# Altium PCB Vehicle_Interface_Tester.PcbDoc (part 2 of 2)
Units mm, origin at the board's own origin, x right, y up, seen from the top; angles counter-clockwise.
Board outline 170 x 109 mm, 8 copper layers (Top Layer, InnerLayer 1 (GND), InnerLayer 2 (Signal), InnerLayer 3 (GND), InnerLayer 4 (Power), InnerLayer 5 (GND), InnerLayer 6 (Signal), Bottom Layer), stack 1.445 mm thick; 100 components, 59 nets, 436 pads, 116 vias.
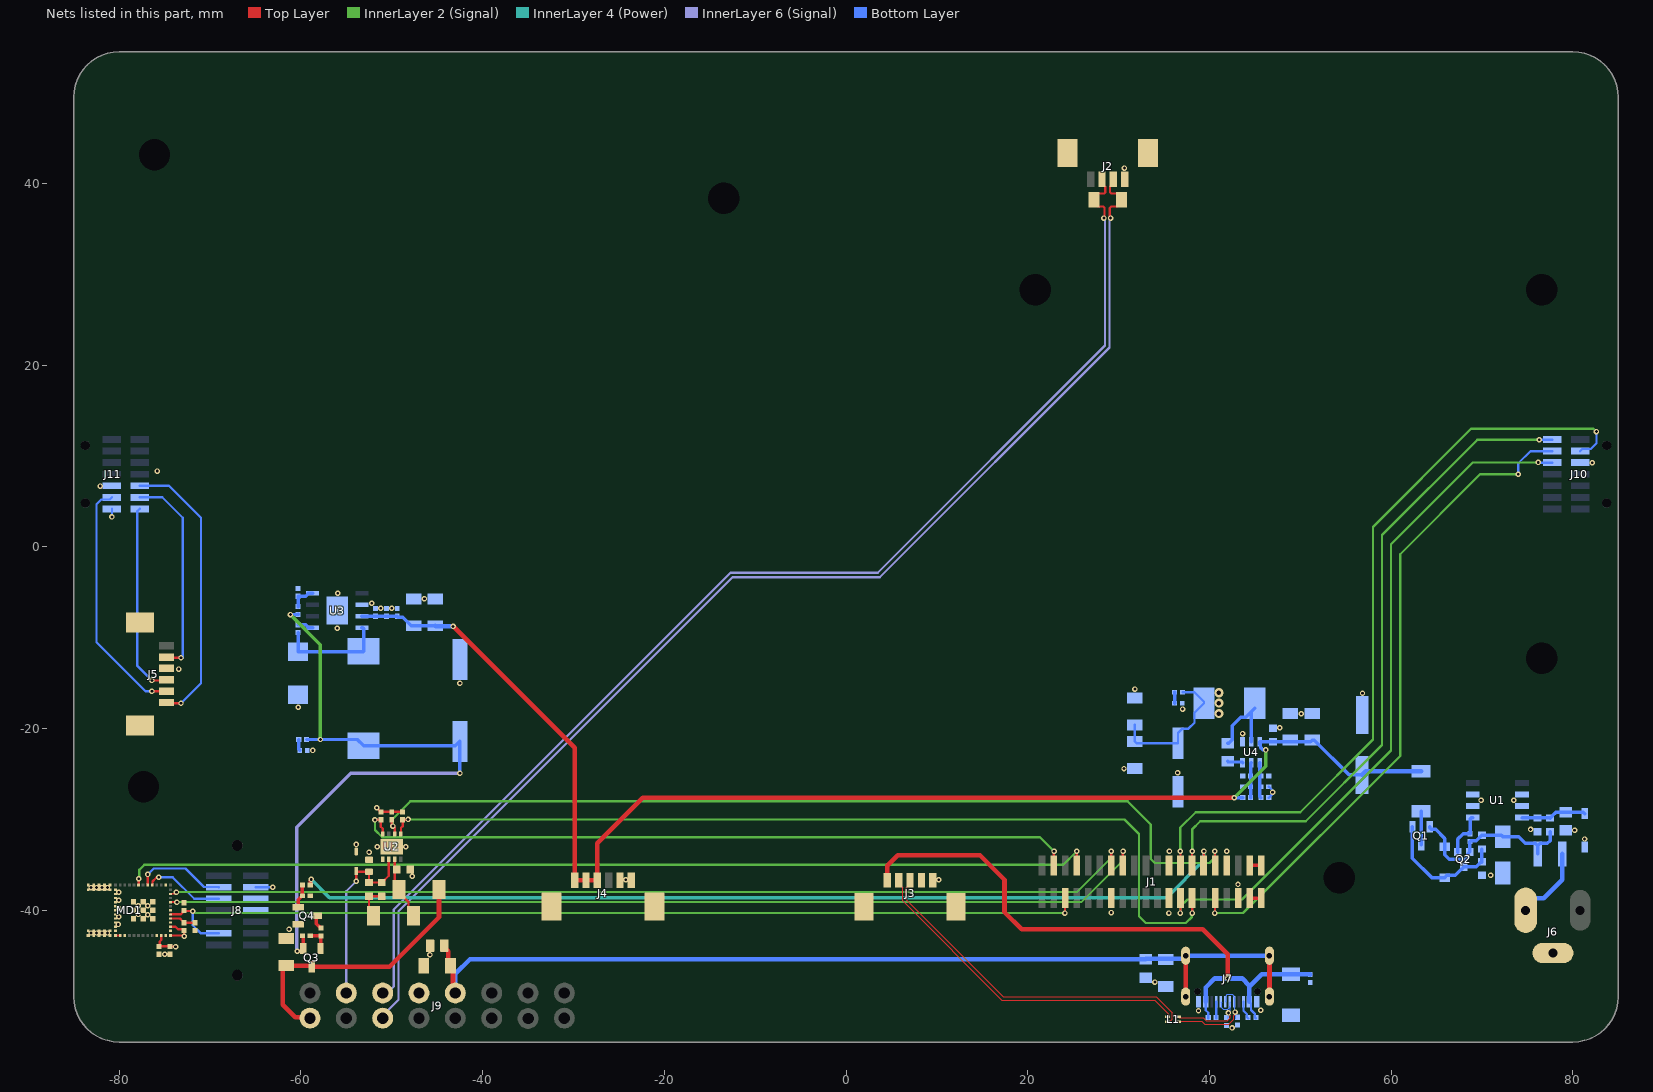
[diagram p8: the nets of this part, all layers, seen from the top]

## Part data (continued)
D5 D6: library part SESD0402X1BN-0010-098, "7V TVS Bidirectional, ESD Suppressors", LCSC Part Number=C2763588, Manufacturer=Littelfuse, Package=0402, Geometry.Height=0.43mm, Manufacturer Part Number=SESD0402X1BN-0010-098
D7: library part 1SMA4736A, "6.8V Zener Diode", LCSC Part Number=C2858511, Manufacturer="MDD(Microdiode Semiconductor)", Package=SMA(DO-214AC), Manufacturer Part Number=1SMA4736A
D10: library part ESD1LIN24DYFR, "42V Clamp 4.3A (8/20µs) Ipp Tvs Diode Surface Mount SOD-323", LCSC Part Number=C20345389, Manufacturer="Texas Instruments", Package=SOD-323, Manufacturer Part Number=ESD1LIN24DYFR
D11 D13: library part "LED Green, 0402 (1005)", "LED Green, 0402 (1005)", Forward Current=20mA, LCSC Part Number=C130723, Manufacturer="Foshan NationStar Optoelectronics", Manufacturer Part Number=NCD0402G1, Package=0402, Color=Green
D12: library part "Schottky, 5A, SS56B", "Schottky Diode, 60V, 5A, DO-214AA, MDD SS56B", LCSC Part Number=C14651, Manufacture="MDD(Microdiode Semiconductor)", Package=SMB(DO-214AA), Manufacturer Part Number=SS56B
J1: "40 Pos, 1.27mm Pitch, Socket, Vertical SMD", LCSC Part Number=C22436137, Manufacturer="Hong Cheng", Package=SMD,P=1.27mm, Manufacturer Part Number=HC-PM127-4.3H-2x20PS
J2: "4 Pos, 1.25mm Pitch, PicoBlade, Horizontal SMD", LCSC Part Number=C696092, Manufacturer=MOLEX, Package="SMD,P=1.25mm,Surface Mount，Right Angle", Manufacturer Part Number=532610471
J3: "5 Pos, 1.25mm Pitch, PicoBlade, Horizontal SMD", LCSC Part Number=C17256390, Manufacturer=MOLEX, Manufacturer Part Number=532610571, Package="SMD,P=1.25mm,Surface Mount，Right Angle"
J4 J5: "6 Pos, 1.25mm Pitch, PicoBlade, Horizontal SMD", LCSC Part Number=C17393620, Manufacturer=MOLEX, Manufacturer Part Number=532610671, Package="SMD,P=1.25mm,Surface Mount，Right Angle"
J6: "Barrel Connector Socket 5.5x2mm", LCSC Part Number=C3096082, Manufacturer=CUI, Package=Plugin,P=5.08mm, Manufacturer Part Number=PJ-002A, Mating Connector=1757022, Part Number=PJ-002A
J7: "CONN USB 2.0 TYPE-C R/A SMT RAISED", LCSC Part Number=C5352763, Manufacturer="Global Connector Technology", Package=SMD, Manufacturer Part Number=USB4800-03-A
J8: "JTAG 14 Pos Header, 1.27mm Pitch, (.5\"), (ST Micro)", LCSC Part Number=C17540447, Manufacturer=Samtec, Manufacturer Part Number=SHF-107-01-L-D-SM-LC, Package=SMD
J10 J11: "14 pos High Reliability Header Strips, 0.050in pitch, Right Angle, Alignment Pins", LCSC Part Number=C21934755, Manufacturer=Samtec, Manufacturer Part Number=FTSH-107-01-X-DH-A, Package="SMD,P=1.27mm,Surface Mount，Right Angle"
L1: library part MCZ1210AH900L2T, "2 Line Common Mode Choke Surface Mount 90 Ohms @ 100 MHz 100mA DCR 1.75Ohm", LCSC Part Number=C114784, Manufacturer=TDK, Manufacturer Part Number=MCZ1210AH900L2TA0G, Package=SMD-4P,1.2x1mm
L2: library part "15uH 7A, 11.5x10mm", "15uH Inductor, 7A, ±20%, 11.5x10mm", LCSC Part Number=C149596, Manufacturer="SXN(Shun Xiang Nuo Elec)", Manufacturer Part Number=SMMS1040-150M, Package=SMD,11.5x10mm
L3: library part "10uH 6A, 7.2x6.6mm", "10uH Inductor, 5.5A, ±20%, 71mΩ, Shielded, 7.2x6mm", LCSC Part Number=C5189958, Manufacturer="SHOU HAN", Manufacturer Part Number=CYA0630-10UH, Package=SMD,7.2x6.6mm
MD1: "Bluetooth Low Energy Module", LCSC Part Number=C5456183, Manufacturer=STMicroelectronics, Package=LGA-77(6.5x10), Manufacturer Part Number=STM32WB1MMCH6TR
MTG1 MTG2 MTG3 MTG4 MTG5 MTG6 MTG7: "M3 Mounting Hole", Manufacturer=DNP, Manufacturer Part Number=DNP
PTC1: library part SMD1210P200TF, "2A Resettable Fuse, 1210", LCSC Part Number=C20808, Manufacturer="RUILON(Shenzhen Ruilongyuan Elec)", Package=1210, Manufacturer Part Number=SMD1210P200TF
Q1 Q3: "MOSFET P-Channel, 60V, VBsemi Elec SQ2309ES-T1-GE3-VB", LCSC Part Number=C6705325, Manufacturer="VBsemi Elec", Package=SOT-23(TO-236), Manufacturer Part Number=SQ2309ES-T1-GE3-VB
Q2: library part "PNP BiPolar Transistor (BJT), 40V, MMBT3906WT1G", "PNP Bipolar Transistor (BJT), 200mA, 40V, SOT-323-3, ON Semi MMBT3906WT1G", LCSC Part Number=C150043, Manufacturer="ON Semiconductor", Manufacturer Part Number=MMBT3906WT1G, Package=SOT-323-3
Q4: library part MMBT3904(RANGE:100-300), "NPN Bipolar Transistor (BJT), 40V, 200mA, SOT-23-3", LCSC Part Number=C20526, Manufacturer="Jiangsu Changjing Electronics Technology Co., Ltd.", Package=SOT-23, Manufacturer Part Number=MMBT3904(RANGE:100-300)
R1: library part "120 ohm, 1206 (3216)", "120 ohm, Resistor, ±1%, 1/4W, 1206 (3216)", LCSC Part Number=C17909, Manufacturer="UNI-ROYAL(Uniroyal Elec)", Manufacturer Part Number=1206W4F1200T5E, Package="1206 (3216 metric)"
R2: library part "24.9K ohm, 0603 (1608)", "24.9K ohm, Resistor, ±1%, 0603 (1608)", LCSC Part Number=C25962, Manufacturer="UNI-ROYAL(Uniroyal Elec)", Manufacturer Part Number=0603WAF2492T5E, Package="0603 (1608 metric)"
R3 R9 R10 R16 R19: library part "10K ohm, 0402 (1005)", "10K ohm, Resistor, ±1%, 0402 (1005)", LCSC Part Number=C881209, Manufacturer="Ever Ohms Tech", Manufacturer Part Number=CR0402F10K0Q10Z, Package="0402 (1005 metric)", Power=100mW
R4: library part "2.49K ohm, 0603 (1608)", "2.49K ohm, Resistor, ±1%, 0603 (1608)", LCSC Part Number=C22908, Manufacturer="UNI-ROYAL(Uniroyal Elec)", Manufacturer Part Number=0603WAF2491T5E, Package="0603 (1608 metric)"
R5: library part "100K ohm, 0603 (1608)", "100K ohm, Resistor, ±1%, 0603 (1608)", LCSC Part Number=C14675, Manufacturer=YAGEO, Manufacturer Part Number=RC0603FR-07100KL, Package="0603 (1608 metric)"
R6 R7: library part "56K ohm, 0402 (1005)", "56K ohm, Resistor, ±1%, 0402 (1005)", LCSC Part Number=C25796, Manufacturer="UNI-ROYAL(Uniroyal Elec)", Manufacturer Part Number=0402WGF5602TCE, Package="0402 (1005 metric)"
R8 R21: library part "10M ohm, 0805 (2012)", "10M ohm, Resistor, ±1%, 0805 (2012)", LCSC Part Number=C26108, Manufacturer="UNI-ROYAL(Uniroyal Elec)", Manufacturer Part Number=0805W8F1005T5E, Package="0805 (2012 metric)"
R11 R12: library part "2K ohm, 0603 (1608)", "2K ohm, ±1%, 0603 (1608)", LCSC Part Number=C22975, Manufacturer="UNI-ROYAL(Uniroyal Elec)", Manufacturer Part Number=0603WAF2001T5E, Package="0603 (1608 metric)"
R13 R14 R15: library part "4.7K ohm, 0402 (1005)", "4.7K ohm, Resistor, ±1%, 0402 (1005)", LCSC Part Number=C25900, Manufacturer="UNI-ROYAL(Uniroyal Elec)", Manufacturer Part Number=0402WGF4701TCE, Package="0402 (1005 metric)"
R17: library part "2.2K ohm, 1206 (3216)", "2.2K ohm, Resistor, ±1%, 1/4W, 1206 (3216)", LCSC Part Number=C17948, Manufacturer="UNI-ROYAL(Uniroyal Elec)", Manufacturer Part Number=1206W4F2201T5E, Package="1206 (3216 metric)"
R18: library part "1K ohm, 0402 (1005)", "1K ohm, Resistor, ±1%, 0402 (1005)", LCSC Part Number=C11702, Manufacturer="UNI-ROYAL(Uniroyal Elec)", Manufacturer Part Number=0402WGF1001TCE, Package="0402 (1005 metric)", Cost=0.013
R20: library part "100K ohm, 0402 (1005)", "100K ohm, Resistor, ±1%, 0402 (1005)", LCSC Part Number=C25741, Manufacturer="UNI-ROYAL(Uniroyal Elec)", Manufacturer Part Number=0402WGF1003TCE, Package="0402 (1005 metric)", Part Number=0402WGF1003TCE
R22: library part "13K ohm, 0402 (1005)", "13K ohm, Resistor, ±1%, 0402 (1005)", LCSC Part Number=C25754, Manufacturer="UNI-ROYAL(Uniroyal Elec)", Manufacturer Part Number=0402WGF1302TCE, Package="0402 (1005 metric)"
R23: library part "21K ohm, 0402 (1005)", "21K ohm, Resistor, ±1%, 0402 (1005)", LCSC Part Number=C25766, Manufacturer="UNI-ROYAL(Uniroyal Elec)", Manufacturer Part Number=0402WGF2102TCE, Package="0402 (1005 metric)"
R24: library part "2K ohm, 0402 (1005)", "2K ohm, Resistor, ±1%, 0402 (1005)", LCSC Part Number=C4109, Manufacturer="UNI-ROYAL(Uniroyal Elec)", Manufacturer Part Number=0402WGF2001TCE, Package="0402 (1005 metric)"
R25: library part "680 ohm, 0402 (1005)", "680 ohm, Resistor, ±1%, 0402 (1005)", LCSC Part Number=C25130, Manufacturer="UNI-ROYAL(Uniroyal Elec)", Manufacturer Part Number=0402WGF6800TCE, Package="0402 (1005 metric)"
R26: library part "300K ohm, 0402 (1005)", "300K ohm, Resistor, ±1%, 0402 (1005)", LCSC Part Number=C25774, Manufacturer="UNI-ROYAL(Uniroyal Elec)", Manufacturer Part Number=0402WGF3003TCE, Package="0402 (1005 metric)"
R27: library part "68K ohm, 0402 (1005)", "68K ohm, Resistor, ±1%, 0402 (1005)", LCSC Part Number=C36871, Manufacturer="UNI-ROYAL(Uniroyal Elec)", Manufacturer Part Number=0402WGF6802TCE, Package="0402 (1005 metric)"
R28: library part "22K ohm, 0402 (1005)", "22K ohm, Resistor, ±1%, 0402 (1005)", LCSC Part Number=C25768, Manufacturer="UNI-ROYAL(Uniroyal Elec)", Manufacturer Part Number=0402WGF2202TCE, Package="0402 (1005 metric)"
R29: library part "15K ohm, 0402 (1005)", "15K ohm, Resistor, ±1%, 0402 (1005)", LCSC Part Number=C25756, Manufacturer="UNI-ROYAL(Uniroyal Elec)", Manufacturer Part Number=0402WGF1502TCE, Package="0402 (1005 metric)"
U1: "Shunt Voltage Reference IC Adjustable 2.495V 36 VV ±1", LCSC Part Number=C6970, Manufacturer="Texas Instruments", Package=SOIC-8, Manufacturer Part Number=TL431AIDR
U2: library part TJA1027TK/20,118, "1/1 Transceiver LINbus 8-HVSON (3x3)", LCSC Part Number=C194379, Manufacturer="NXP Semicon", Package=HVSON-8-EP(3x3), Manufacturer Part Number=TJA1027TK/20,118
U3: "Texas Instruments switching V reg, step down, 5A wide range input TPS5450DDAR", LCSC Part Number=C114425, Manufacturer="Texas Instruments", Package=SOP-8-EP-150mil, Manufacturer Part Number=TPS5450DDAR
U4: "Ti Switching V Regulator, Step Down, 3A, Ti TPS54302DDCR", LCSC Part Number=C311983, Manufacturer="Texas Instruments", Package=TSOT-23-6, Manufacturer Name="Texas Instruments", Manufacturer Part Number=TPS54302DDCR
J9: Vendor="Nemalyn Segura <nemalyn@autotestaid.com>"

## Via types
v1: diameter 0.6, hole 0.3, Top Layer to Bottom Layer, tented both sides, 113 vias
v2: diameter 1, hole 0.5, Top Layer to Bottom Layer, tented both sides, 3 vias

## Nets (pads, with @x,y where several pads share a name; then routed paths per layer and width w, separated by ;. In a path a pad name is that pad's centre, name@x,y a point inside that pad or via, vN(x,y) a via of type N, cw(c..) or ccw(c..) an arc to the next point about the centre after c; other vN are vias at no path point)
3V3: C5.1 C6.1 C23.1 C24.1 C25.1 C26.1 J8.3 J11.1 L3.2 MD1.16 MD1.18 MD1.20 R9.2 R13.2 R14.2 R15.2 R25.2 R27.2 | length 29.7
  Top Layer w0.254: C5.1@-75.6,-43.967 C6.1@-74.4,-43.967 -74.383,-43.984 -73.816,-43.984 v1(-73.8,-44) ; C5.1@-75.6,-43.954 -75.552,-43.906 -75.552,-43.452 -75.364,-43.264 MD1.16@-75.364,-42.775 ; MD1.18@-74.337,-42.775 -73.019,-42.775 -72.944,-42.85 v1(-72.85,-42.85) -72.874,-42.826 R9.2@-72.874,-42.445 ; MD1.20@-74.337,-41.8 -73.8,-41.8 -73.523,-42.077 -72.993,-42.077 -72.85,-42.22 R9.2@-72.85,-42.233 ; v1(-51.65,-28.7) -51.183,-29.167 R15.2@-48.8,-29.167
  Bottom Layer w0.254: v1(-80.8,3.3) J11.1@-80.8,4.19 ; J8.3@-64.968,-37.46 -64.962,-37.466 -63.106,-37.466 v1(-63.1,-37.472) ; C26.1@31.8,-19.579 C25.1@31.8,-21.421 31.984,-21.605 C23.1@36.553,-21.605 36.553,-20.473 37.026,-20 37.7,-20 38.352,-19.348 38.352,-18.248 L3.2@39.4,-17.2 39.4,-17.048 38.352,-16 R25.2@37.033,-16 ; C24.1@46.533,-27.6 46.546,-27.6 46.884,-27.262 46.884,-27.006 46.95,-26.94 46.884,-26.874 46.884,-26.738 46.545,-26.4 R27.2@46.533,-26.4
  other v1: 46.95,-27
  other v2: 41.05,-18.35 41.05,-17.2 41.05,-16.05
3V3_SW: C18.2 L3.1 U4.2 | length 8.8
  Bottom Layer w0.381: C18.2@42,-21.6 42.122,-21.6 42.498,-21.224 42.498,-19.702 43.441,-18.759 44.015,-18.759 L3.1@45,-17.775 ; U4.2@44.6,-21.45 L3.1@44.6,-18.175
14V: C17.1 L2.2 Q3.2 R16.2 R22.2 R23.2 | length 73.2
  Top Layer w0.381: v1(-60.4,-44.5) -59.909,-44.5 -59.75,-44.341 Q3.2@-59.75,-44.2 -59.75,-42.88 -59.83,-42.8 R16.2@-59.833,-42.8
  InnerLayer 2 (Signal) w0.381: v1(-61.15,-7.45) -57.85,-10.75 v1(-57.85,-21.2)
  InnerLayer 6 (Signal) w0.381: v1(-60.4,-44.5) -60.45,-44.45 -60.45,-30.85 -54.5,-24.9 v1(-42.5,-24.9)
  Bottom Layer w0.381: v1(-61.15,-7.45) -61.141,-7.441 -60.309,-7.441 R23.2@-60.3,-7.433 ; R22.2@-59.367,-21.2 v1(-57.85,-21.2) -53.8,-21.2 L2.2@-53.1,-21.9 -43,-21.9 C17.1@-42.5,-21.4 v1(-42.5,-24.9)
14V_SWITCHED: D9.2 J9.16 Q3.3 R17.2 | length 30.3
  Top Layer w0.508: J9.16@-59,-51.87 -59.079,-51.791 -60.609,-51.791 -62,-50.4 -62,-46.45 -61.65,-46.1 R17.2@-61.6,-46.1 -58.896,-46.1 -58.8,-46.196 Q3.3@-58.8,-46.2 -50.25,-46.2 -44.8,-40.75 D9.2@-44.8,-37.7
24V_SW: C12.1 C13.1 C14.1 C15.1 C16.1 C19.1 C20.1 C21.1 C22.1 D1.1 J4.1 J4.2 J4.3 R26.2 U3.7 U4.3 | length 151.3
  Top Layer w0.508: v1(-43.25,-8.75) -29.875,-22.125 J4.1@-29.875,-36.695 J4.2@-28.625,-36.695 J4.3@-27.375,-36.695 -27.375,-32.625 -22.35,-27.6 v1(42.75,-27.6)
  InnerLayer 2 (Signal) w0.381: v1(42.75,-27.6) 46.2,-24.15 v1(46.2,-22.35)
  Bottom Layer w0.381: U3.7@-53.279,-7.635 -53.278,-7.634 C14.1@-49.4,-7.633 C14.1@-49.4,-7.633 -49.4,-7.646 -49.32,-7.725 -48.8,-7.725 -47.847,-8.679 C15.1@-47.6,-8.679 C16.1@-45.2,-8.679 ; v1(42.75,-27.6) R26.2@43.667,-27.6 ; v1(46.2,-22.35) 46.158,-22.308 45.858,-22.308 45.626,-22.076 45.626,-21.796 45.55,-21.72 U4.3@45.55,-21.45 51.129,-21.45 C20.1@51.3,-21.279 51.547,-21.279 55.368,-25.1 C19.1@56.8,-25.1
  Bottom Layer w0.508: C16.1@-45.2,-8.679 -45.147,-8.732 -43.268,-8.732 v1(-43.25,-8.75) ; C19.1@56.8,-25.1 57.2,-24.7 D1.1@63.3,-24.7
+5V: J1.1 J1.3 | length 1.3
  Top Layer w0.381: J1.3@44.443,-35.058 J1.1@45.713,-35.058
BLE_MODULE_SWCLK: J8.6 MD1.34 | length 8.9
  Top Layer w0.254: MD1.34@-76.367,-37.225 -76.344,-37.202 -76.344,-36.844 -75.916,-36.416 -75.716,-36.416 v1(-75.65,-36.35)
  Bottom Layer w0.254: v1(-75.65,-36.35) -74.12,-36.35 -71.74,-38.73 J8.6@-69.033,-38.73
BLE_MODULE_SWDIO: J8.4 MD1.35 | length 10.1
  Top Layer w0.254: MD1.35@-76.868,-37.225 -76.859,-37.216 -76.859,-36.059 v1(-76.85,-36.05)
  Bottom Layer w0.254: v1(-76.85,-36.05) -76.2,-35.4 -72.7,-35.4 -70.662,-37.438 -69.055,-37.438 J8.4@-69.033,-37.46
BLE_RESET: C7.1 J1.36 J8.12 MD1.23 | length 105.1
  Top Layer w0.254: MD1.23@-74.337,-40.45 -73.234,-40.45 -72.993,-40.21 -72.993,-40.189 -72.871,-40.066 -71.934,-40.066 v1(-71.9,-40.1) ; v1(24.1,-40.3) 24.111,-40.289 24.111,-38.669 J1.36@24.123,-38.658
  InnerLayer 2 (Signal) w0.254: v1(-71.9,-40.1) -71.806,-40.1 -71.606,-40.3 v1(24.1,-40.3)
  Bottom Layer w0.254: v1(-71.9,-40.1) -71.9,-41.65 -71.01,-42.54 J8.12@-69.033,-42.54
BLE_RX: J1.27 MD1.28 | length 107.5
  Top Layer w0.203: MD1.28@-74.337,-38.2 -74.313,-38.177 -73.934,-38.177 -73.757,-38 v1(-73.7,-38)
  Top Layer w0.254: v1(29.2,-33.5) 29.203,-33.503 J1.27@29.203,-35.058
  InnerLayer 2 (Signal) w0.203: v1(-73.7,-38) 25.4,-38 29.2,-34.2 v1(29.2,-33.5)
BLE_TX: J1.25 MD1.26 | length 109.3
  Top Layer w0.203: MD1.26@-74.337,-39.1 v1(-73.65,-39.1)
  Top Layer w0.254: J1.25@30.473,-35.058 30.473,-33.527 v1(30.5,-33.5)
  InnerLayer 2 (Signal) w0.203: v1(-73.65,-39.1) 25.9,-39.1 30.5,-34.5 v1(30.5,-33.5)
BLE_WKUP: J1.33 MD1.37 | length 107.3
  Top Layer w0.254: MD1.37@-77.872,-37.225 -77.857,-37.211 -77.857,-36.547 v1(-77.843,-36.532) ; J1.33@25.393,-35.058 25.396,-35.054 25.396,-33.504 v1(25.4,-33.5)
  InnerLayer 2 (Signal) w0.254: v1(-77.843,-36.532) -77.8,-36.489 -77.8,-35.55 -77.25,-35 23.9,-35 v1(25.4,-33.5)
CAN_N: J2.2 J9.14 R1.2 | length 136.7
  Top Layer w0.254: v1(29.118,36.2) 29.118,36.294 29.031,36.38 29.031,37.305 29.203,37.476 29.823,37.476 R1.2@30.3,37.953 ; J2.2@29.425,40.465 29.425,40.021 29.054,39.65 29.054,39.049 29.203,38.9 29.823,38.9 30.3,38.423 R1.2@30.3,38.2
  InnerLayer 6 (Signal) w0.254: J9.14@-51,-51.87 -51,-51.573 -49.265,-49.838 -49.265,-40.115 -12.497,-3.347 3.703,-3.347 29.008,21.958 29.008,36.091 v1(29.118,36.2)
CAN_P: J2.3 J9.6 R1.1 | length 133.9
  Top Layer w0.254: R1.1@27.3,37.953 27.777,37.476 28.308,37.476 28.457,37.328 28.457,36.266 v1(28.391,36.2) ; R1.1@27.3,38.2 27.3,38.423 27.777,38.9 28.397,38.9 28.546,39.049 28.546,39.65 28.175,40.021 J2.3@28.175,40.465
  InnerLayer 6 (Signal) w0.254: J9.6@-51,-49.11 -50.5,-49.11 -49.773,-48.382 -49.773,-39.904 -12.707,-2.839 3.493,-2.839 28.5,22.168 28.5,36.091 v1(28.391,36.2)
CHS_GND: C3.1 C10.1 J7.S1 J7.S2 J7.S3 J7.S4 J9.4 R8.1 R21.1 | length 107.2
  Top Layer w0.508: R21.1@-44.22,-43.9 -44.22,-44.103 -43.8,-44.523 -43.8,-45.821 -43.26,-46.361 -43.26,-48.85 J9.4@-43,-49.11 ; J7.S3@37.39,-49.5 J7.S1@37.39,-45 ; J7.S4@46.61,-49.5 J7.S2@46.61,-45
  Bottom Layer w0.508: J9.4@-43,-49.11 -43,-47 -41.384,-45.384 R8.1@33,-45.384 ; R8.1@33,-45.32 35.2,-45.32 37.163,-45.32 J7.S1@37.39,-45.093 ; J7.S1@37.39,-45 J7.S2@46.61,-45
GND: C2.2 C3.2 C4.2 C5.2 C6.2 C7.2 C8.2 C9.2 C10.2 C12.2 C13.2 C14.2 C15.2 C16.2 C17.2 C19.2 C20.2 C21.2 C22.2 C23.2 C25.2 C26.2 C27.2 D3.1 D4.2 D5.1 D6.1 D7.2 D10.2 D11.1 D12.2 D13.1 J1.6 J1.7 J1.17 J1.18 J1.28 J2.0 J2.1 J3.0 J3.5 J4.0 J4.5 J4.6 J5.0 J5.3 J6.3 J7.A1_B12 J7.B1_A12 J8.5 J8.7 J9.5 J10.5 J11.5 MD1.1 MD1.2 MD1.3 MD1.4 MD1.5 MD1.8 MD1.15 MD1.17 MD1.19 MD1.21 MD1.24 MD1.31 MD1.43 MD1.44 MD1.45 MD1.46 MD1.47 MD1.48 MD1.49 MD1.50 MD1.51 MD1.52 MD1.53 MD1.54 MD1.55 MD1.56 MD1.57 MD1.58 MD1.59 MD1.60 MD1.61 MD1.62 MD1.63 MD1.64 MD1.65 MD1.66 MD1.67 MD1.68 MD1.69 MD1.70 MD1.71 MD1.72 MD1.73 MD1.74 MD1.75 MD1.76 MD1.77 Q4.2 R4.1 R5.2 R8.2 R10.2 R17.1 R20.1 R21.2 R24.1 R28.1 R29.1 U1.2 U1.3 U1.6 U1.7 U2.5 U2.9 U3.6 U3.EP U4.1 | length 0.1
  Top Layer w0.254: v1@35.553,-33.547 v1(35.6,-33.5)
  other v1: 42.5,-52.95 38.8,-51.05 45.65,-51 34,-47.9 -45.8,-44.9 -75,-44.85 -83.1,-42.5 -82.5,-42.5 -81.9,-42.5 -81.3,-42.5 -61.3,-42.1 -80.1,-41.55 -80.05,-40.7 -76.85,-40.5 -77.9,-40.45 35.55,-40.3 29.2,-40.25 -80.05,-39.75 -77.9,-39.5 -76.85,-39.5 -80.05,-38.9 -80.05,-38 -83.1,-37.5 -82.5,-37.5 -81.9,-37.5 -81.3,-37.5 43.15,-37.15 -24.25,-36.65 10.2,-36.65 -47.75,-36.25 70.95,-36.15 -52.5,-33.6 41.9,-33.5 -51.6,-33 -48.45,-33 -53.9,-32.75 81.3,-32.15 80.2,-31.2 75.35,-31.1 69.9,-27.9 73.5,-27.9 36.5,-24.85 30.6,-24.4 -58.7,-22.4 43.65,-20.55 47.75,-19.9 50.1,-18.35 37.05,-17.85 -60.3,-17.65 56.85,-16.1 31.8,-15.65 -42.5,-15 -73.45,-13.45 -56,-8.95 -51.2,-6.75 -50,-6.75 -52.2,-6.2 -46.4,-5.7 -55.95,-5.1 -82.1,6.7 -75.8,8.35 82.15,9.25 30.65,41.7
ISO-K_LINE: C9.1 D10.1 J9.7 R11.2 R12.2 U2.6 | length 20.8
  Top Layer w0.254: v1(-53.9,-36.8) D10.1@-53.9,-35.676 ; D10.1@-53.9,-35.681 -53.831,-35.75 C9.1@-52.5,-35.75 R12.2@-52.5,-36.947 R11.2@-51.1,-36.947 ; R11.2@-51.071,-36.947 -50.325,-36.201 U2.6@-50.325,-34.4
  InnerLayer 6 (Signal) w0.254: J9.7@-55,-49.11 -55,-37.9 v1(-53.9,-36.8)
LIN_RXD: J1.14 R15.1 U2.1 | length 100.9
  Top Layer w0.254: U2.1@-49.025,-31.6 -48.987,-31.562 -48.987,-30.919 -48.8,-30.732 R15.1@-48.8,-30.033 -48.783,-30.016 -48.216,-30.016 v1(-48.2,-30) ; J1.14@38.093,-38.658 38.1,-38.665 v1(38.1,-40.3)
  InnerLayer 2 (Signal) w0.254: v1(-48.2,-30) 30.65,-30 32.25,-31.6 32.25,-40.65 33,-41.4 37.4,-41.4 38.072,-40.728 38.072,-40.328 v1(38.1,-40.3)
LIN_SLP_N: J1.9 R14.1 U2.2 | length 101.3
  Top Layer w0.254: R14.1@-50,-30.033 -50,-30.6 -49.675,-30.925 U2.2@-49.675,-31.6 ; v1(40.6,-33.5) 40.616,-33.516 40.616,-35.042 J1.9@40.633,-35.058
  InnerLayer 2 (Signal) w0.254: v1(-49.875,-30.725) -49.875,-29.925 -47.95,-28 31,-28 33.55,-30.55 33.55,-34.35 34,-34.8 40,-34.8 40.6,-34.2 v1(40.6,-33.5)
LIN_TXD: J1.37 R13.1 U2.4 | length 80.7
  Top Layer w0.254: v1(-51.85,-30.05) -51.841,-30.041 -51.209,-30.041 R13.1@-51.2,-30.033 -51.2,-30.8 -51.049,-30.951 -50.975,-31.025 U2.4@-50.975,-31.6 ; J1.37@22.853,-35.058 22.876,-35.034 22.876,-33.524 v1(22.9,-33.5)
  InnerLayer 2 (Signal) w0.254: v1(-51.85,-30.05) -51.85,-31.15 -51.05,-31.95 21.35,-31.95 v1(22.9,-33.5)
NetC1_1: C1.1 D2.1 D3.2 PTC1.2 Q1.2 Q2.2 R2.2 R3.2 | length 20.4
  Bottom Layer w0.381: Q1.2@64.25,-30.8 64.25,-30.941 64.41,-31.1 64.9,-31.1 65.9,-32.1 D2.1@65.9,-33 65.9,-33.9 66.4,-34.4 68.217,-34.4 68.44,-34.177 68.44,-33.809 68.675,-33.575 68.675,-32.458 R3.2@68.7,-32.433 ; R3.2@68.7,-32.42 68.78,-32.34 69.381,-32.34 69.971,-31.75 C1.1@70,-31.75 72.15,-31.75 D3.2@72.3,-31.9 74.064,-31.9 74.783,-32.619 75.887,-32.619 PTC1.2@76.154,-32.886 ; PTC1.2@76.154,-33.8 PTC1.2@76.154,-32.886 ; R2.2@77.5,-31.353 77.5,-32.328 77.209,-32.619 76.42,-32.619 PTC1.2@76.154,-32.886
NetC1_2: C1.2 D2.2 Q1.1 Q2.3 R5.1 | length 14.2
  Bottom Layer w0.381: Q1.1@62.35,-30.8 62.35,-34.25 64.5,-36.4 D2.2@65.9,-36.4 66.147,-36.153 67.047,-36.153 67.741,-35.459 67.791,-35.459 68,-35.25 Q2.3@68,-35.2 69.37,-35.2 69.87,-34.7 70,-34.7 C1.2@70,-33.25
NetC2_1: C2.1 D4.1 R2.1 R4.2 U1.8 | length 7.2
  Bottom Layer w0.381: U1.8@74.412,-29.805 74.433,-29.826 77.479,-29.826 R2.1@77.5,-29.846 ; R2.1@77.529,-29.846 77.742,-29.634 77.742,-29.605 78.146,-29.2 C2.1@79.2,-29.2 81.15,-29.2 D4.1@81.3,-29.35
NetC8_1: C8.1 D8.2 D9.1 U2.7 | length 7.1
  Top Layer w0.254: U2.7@-49.675,-34.4 -49.675,-37.225 D9.1@-49.2,-37.7 -49.2,-38.05 -48.15,-39.1 -48.15,-40.05 D8.2@-47.6,-40.6
NetC11_1: C11.1 U3.1 | length 1.7
  Bottom Layer w0.381: C11.1@-60.3,-8.567 -59.481,-8.567 -59.258,-8.79 -59.258,-8.829 -59.182,-8.905 U3.1@-58.721,-8.905
NetC11_2: C11.2 D12.1 L2.1 U3.8 | length 12.1
  Bottom Layer w0.381: C11.2@-60.3,-9.433 D12.1@-60.3,-11.538 -53.138,-11.538 L2.1@-53.1,-11.5 -53.1,-8.981 -53.176,-8.905 U3.8@-53.279,-8.905
NetC18_1: C18.1 U4.6 | length 1.7
  Bottom Layer w0.381: C18.1@42,-23.6 42.075,-23.675 43.575,-23.675 U4.6@43.65,-23.75
NetC24_2: C24.2 R27.1 R29.2 U4.4 | length 3.9
  Bottom Layer w0.381: U4.4@45.55,-23.75 45.55,-27.495 45.655,-27.6 C24.2@45.667,-27.6
NetC27_1: C27.1 R26.1 R28.2 U4.5 | length 3.9
  Bottom Layer w0.381: R26.1@44.533,-27.6 44.567,-27.567 44.567,-23.784 U4.5@44.6,-23.75
NetD1_2: D1.2 Q1.3 | length 3.7
  Bottom Layer w0.381: Q1.3@63.3,-32.8 D1.2@63.3,-29.1
NetD8_1: D8.1 R11.1 R12.1 | length 3.8
  Top Layer w0.254: D8.1@-52,-40.6 -52.5,-40.1 R12.1@-52.5,-38.453 R11.1@-51.1,-38.453
NetD11_2: D11.2 R22.1 | length 1.2
  Bottom Layer w0.381: R22.1@-60.233,-21.2 -60.233,-22.293 -60.14,-22.386 D11.2@-60.14,-22.406
NetD13_2: D13.2 R25.1 | length 1.2
  Bottom Layer w0.381: D13.2@36.16,-17.206 36.164,-17.203 36.164,-16.003 R25.1@36.167,-16
NetJ1_10: J1.10 J10.4 | length 73.6
  Top Layer w0.254: v1(40.6,-40.3) 40.616,-40.284 40.616,-38.674 J1.10@40.633,-38.658
  InnerLayer 2 (Signal) w0.254: v1(40.6,-40.3) 43.7,-40.3 61,-23 61,-0.8 69.8,8 v1(74,8)
  Bottom Layer w0.254: v1(74,8) 74,9.2 75.34,10.54 J10.4@77.75,10.54
NetJ1_11: J1.11 R19.2 | length 104
  Top Layer w0.254: J1.11@39.363,-35.058 39.363,-33.537 v1(39.4,-33.5)
  Top Layer w0.381: R19.2@-58.967,-37.2 -58.967,-36.717 v1(-58.85,-36.6)
  InnerLayer 4 (Power) w0.381: v1(-58.85,-36.6) -56.85,-38.6 35.3,-38.6 39.4,-34.5 v1(39.4,-33.5)
NetJ1_13: J1.13 J10.2 | length 74.9
  Top Layer w0.254: J1.13@38.093,-35.058 38.093,-33.507 v1(38.1,-33.5)
  InnerLayer 2 (Signal) w0.254: v1(38.1,-33.5) 38.1,-31.1 39,-30.2 50.6,-30.2 59,-21.8 59,1.3 69.5,11.8 v1(76.3,11.8)
  Bottom Layer w0.254: v1(76.3,11.8) 76.31,11.81 J10.2@77.75,11.81
NetJ1_15: J1.15 J10.3 | length 85.4
  Top Layer w0.254: v1(36.8,-33.5) 36.811,-33.511 36.811,-35.047 J1.15@36.823,-35.058
  InnerLayer 2 (Signal) w0.254: v1(36.8,-33.5) 36.8,-30.9 38.5,-29.2 50,-29.2 58,-21.2 58,2.2 68.8,13 82.278,13 82.578,12.7 v1(82.6,12.7)
  Bottom Layer w0.254: J10.3@80.8,10.54 81.043,10.783 81.983,10.783 82.6,11.4 v1(82.6,12.7)
NetJ1_16: J1.16 J10.6 | length 76.8
  Top Layer w0.254: v1(36.8,-40.3) 36.823,-40.277 J1.16@36.823,-38.658
  InnerLayer 2 (Signal) w0.254: v1(36.8,-40.3) 36.8,-39.6 37.6,-38.8 43.6,-38.8 60,-22.4 60,0.3 69,9.3 v1@76.178,9.3
  Bottom Layer w0.254: v1(76.2,9.3) 76.23,9.27 J10.6@77.75,9.27
NetJ3_4: J3.4
NetJ5_2: J5.2 J11.4 | length 22.6
  Top Layer w0.254: J5.2@-74.695,-12.175 -74.671,-12.2 v1(-73.2,-12.2)
  Bottom Layer w0.254: J11.4@-77.75,5.46 -75.26,5.46 -73,3.2 v1@-73,-12.2
NetJ5_4: J5.4 J11.2 | length 21.4
  Top Layer w0.254: v1(-76.4,-14.7) -74.72,-14.7 J5.4@-74.695,-14.675
  Bottom Layer w0.254: J11.2@-77.75,4.19 -78,3.94 -78,-13.1 v1(-76.4,-14.7)
NetJ5_5: J5.5 J11.3 | length 27.3
  Top Layer w0.254: v1(-76.4,-15.9) -74.721,-15.9 J5.5@-74.695,-15.925
  Bottom Layer w0.254: J11.3@-80.8,5.46 -81.043,5.217 -81.983,5.217 -82.5,4.7 -82.5,-10.5 -77.1,-15.9 v1(-76.4,-15.9)
NetJ5_6: J5.6 J11.6 | length 31
  Top Layer w0.254: J5.6@-74.695,-17.175 -74.671,-17.2 v1(-73.2,-17.2)
  Bottom Layer w0.254: J11.6@-77.75,6.73 -74.53,6.73 -71,3.2 -71,-15 v1(-73.2,-17.2)
NetJ6_1: J6.1 PTC1.1 | length 8.5
  Bottom Layer w0.508: J6.1@74.81,-40 74.81,-39.598 75.73,-38.678 76.822,-38.678 78.846,-36.654 PTC1.1@78.846,-33.8
NetJ7_A5: J7.A5 R6.2 | length 1.8
  Bottom Layer w0.254: R6.2@40.749,-51.901 40.75,-51.9 J7.A5@40.75,-50.075
NetJ7_B5: J7.B5 R7.2 | length 2
  Bottom Layer w0.254: J7.B5@43.75,-50.075 43.75,-51.05 44.142,-51.442 44.142,-51.774 R7.2@44.267,-51.9
NetMD1_6: MD1.6 MD1.7 | length 0.5
  Top Layer w0.254: MD1.6@-80.4,-42.775 MD1.7@-79.875,-42.775
NetMD1_22: MD1.22 R9.1 R10.1 | length 2.6
  Top Layer w0.254: MD1.22@-74.337,-40.9 -73.317,-40.9 -73.006,-41.211 -72.993,-41.211 -72.85,-41.354 R9.1@-72.85,-41.367 R10.1@-71.9,-41.367
NetQ2_1: Q2.1 R3.1 U1.1 | length 5
  Bottom Layer w0.381: Q2.1@67.35,-33.6 67.35,-32.15 67.933,-31.567 R3.1@68.7,-31.567 68.7,-29.94 68.835,-29.805 U1.1@68.988,-29.805
NetQ3_1: Q3.1 R16.1 R18.2 | length 2.6
  Top Layer w0.381: R16.1@-58.967,-42.8 -58.951,-42.816 -57.816,-42.816 -57.825,-42.825 -57.825,-44.175 Q3.1@-57.85,-44.2
NetQ4_1: Q4.1 R19.1 R20.2 | length 2.7
  Top Layer w0.381: Q4.1@-60.3,-39.65 -60.3,-38.855 -59.845,-38.4 R20.2@-59.833,-38.4 R19.1@-59.833,-37.2
NetQ4_3: Q4.3 R18.1 | length 1.6
  Top Layer w0.381: Q4.3@-58.3,-40.6 -58.3,-41.467 -58.077,-41.69 -58.064,-41.69 -57.8,-41.954 R18.1@-57.8,-41.967
NetR23_1: R23.1 R24.2 U3.4 | length 2.9
  Bottom Layer w0.381: R23.1@-60.3,-6.567 R24.2@-60.3,-5.433 -59.481,-5.433 -59.258,-5.209 -59.258,-5.171 -59.182,-5.095 U3.4@-58.721,-5.095
USB_CONN_N: D6.2 J7.A7 J7.B7 L1.2 | length 10.4
  Top Layer w0.127: L1.2@36.612,-51.725 36.697,-51.81 39.309,-51.81 39.645,-52.145 41.949,-52.145 42.273,-51.821 42.273,-51.601 42.1,-51.428 v1(42.1,-51.3)
  Bottom Layer w0.127: J7.B7@41.25,-50.075 41.336,-50.161 41.336,-50.726 41.501,-50.891 41.999,-50.891 42.163,-50.726 42.163,-50.637 J7.A7@42.25,-50.55 ; D6.2@42.1,-51.967 42.1,-51.172 42.283,-50.99 42.283,-50.55 42.283,-50.108 J7.A7@42.25,-50.075
USB_CONN_P: D5.2 J7.A6 J7.B6 L1.1 | length 11.6
  Top Layer w0.127: L1.1@36.612,-52.275 36.697,-52.191 39.151,-52.191 39.487,-52.526 42.106,-52.526 42.654,-51.978 42.654,-51.601 42.827,-51.428 v1@42.827,-51.3
  Bottom Layer w0.127: J7.A6@41.75,-50.075 41.837,-49.989 41.837,-49.408 41.985,-49.26 42.515,-49.26 42.664,-49.408 42.664,-49.514 42.788,-49.638 v1@42.788,-51.262 ; v1@42.788,-51.162 42.893,-51.266 D5.2@42.893,-51.919
  other v1: 42.827,-51.2
USB_D_N: J3.2 L1.3 | length 37.3
  Top Layer w0.127: J3.2@5.802,-36.695 5.802,-37.095 6.138,-37.431 6.162,-37.431 6.236,-37.506 6.236,-38.975 17.142,-49.881 33.981,-49.881 35.519,-51.419 35.519,-51.636 35.43,-51.725 L1.3@35.387,-51.725
USB_D_P: J3.3 L1.4 | length 38.1
  Top Layer w0.127: J3.3@7.052,-36.695 7.052,-37.095 6.715,-37.431 6.692,-37.431 6.617,-37.506 6.617,-38.817 17.3,-49.5 34.139,-49.5 35.9,-51.261 35.9,-52 35.714,-52.186 35.476,-52.186 L1.4@35.387,-52.275
VBUS: C4.1 D7.1 J3.1 J7.A4_B9 J7.B4_A9 R6.1 R7.1 | length 69
  Top Layer w0.508: J3.1@4.552,-36.695 4.552,-35.098 5.7,-33.95 14.75,-33.95 17.45,-36.65 17.45,-40.2 19.35,-42.1 39.25,-42.1 42,-44.85 v1(42,-47.5)
  Bottom Layer w0.254: J7.A4_B9@39.6,-50.075 39.6,-51 39.867,-51.267 R6.1@39.867,-51.9 ; J7.B4_A9@44.4,-50.075 44.573,-50.248 44.573,-50.973 45.025,-51.425 45.025,-51.792 R7.1@45.133,-51.9
  Bottom Layer w0.508: J7.A4_B9@39.6,-50.075 39.6,-48.5 40.6,-47.5 v1(42,-47.5) 43.6,-47.5 44.4,-48.3 ; J7.B4_A9@44.4,-50.075 44.4,-48.3 ; C4.1@51.1,-47.067 51.084,-47.05 D7.1@49,-47.05 45.75,-47.05 44.5,-48.3 44.4,-48.3
VCC: J1.2 J1.4 | length 1.3
  Top Layer w0.381: J1.4@44.443,-38.658 J1.2@45.713,-38.658
pads on no net: J1.5 J1.8 J1.12 J1.19 J1.20 J1.21 J1.22 J1.23 J1.24 J1.26 J1.29 J1.30 J1.31 J1.32 J1.34 J1.35 J1.38 J1.39 J1.40 J2.4 J4.4 J5.1 J6.2 J7. J7.A8 J7.B8 J8. J8.1 J8.2 J8.8 J8.9 J8.10 J8.11 J8.13 J8.14 J9.1 J9.2 J9.3 J9.8 J9.9 J9.10 J9.11 J9.12 J9.13 J9.15 J10. J10.1 J10.7 J10.8 J10.9 J10.10 J10.11 J10.12 J10.13 J10.14 J11. J11.7 J11.8 J11.9 J11.10 J11.11 J11.12 J11.13 J11.14 MD1.9 MD1.10 MD1.11 MD1.12 MD1.13 MD1.14 MD1.25 MD1.27 MD1.29 MD1.30 MD1.32 MD1.33 MD1.36 MD1.38 MD1.39 MD1.40 MD1.41 MD1.42 MTG1.1 MTG2.1 MTG3.1 MTG4.1 MTG5.1 MTG6.1 MTG7.1 U1.4 U1.5 U2.3 U2.8 U3.2 U3.3 U3.5

## Polygon pours and split planes (outlines as drawn)
GND on Bottom Layer "GND BOTTOM" (solid, pour order 8): -85,54.5 85,54.5 85,-54.5 -85,-54.5
3V3 on Bottom Layer "3V3 BUCK OUTPUT" (solid, pour order 7): 38.25,-15.45 38.25,-18.95 41.25,-18.95 41.65,-18.55 41.65,-15.85 41.25,-15.45
3V3 on InnerLayer 4 (Power) "3V3 PLANE" (solid, pour order 0): -85,54.5 85,54.5 85,-54.5 -85,-54.5
GND on InnerLayer 1 (GND) "GND INNER 1" (solid, pour order 2): -85,54.5 85,54.5 85,-54.5 -85,-54.5
GND on InnerLayer 3 (GND) "GND INNER 3" (solid, pour order 4): -85,54.5 85,54.5 85,-54.5 -85,-54.5
GND on InnerLayer 5 (GND) "GND INNER 5" (solid, pour order 5): -85,54.5 85,54.5 85,-54.5 -85,-54.5
GND on InnerLayer 6 (Signal) "GND INNER 6" (solid, pour order 6): -85,54.5 85,54.5 85,-54.5 -85,-54.5
GND on Top Layer "GND TOP" (solid, pour order 1): -85,54.5 85,54.5 85,-54.5 -85,-54.5
GND on InnerLayer 2 (Signal) "GND INNER 2" (solid, pour order 3): -85,54.5 85,54.5 85,-54.5 -85,-54.5

## Other copper
Top Layer:
  pour cut-out: -85,-37.9 -80.6,-37.9 -80.6,-42.1 -85,-42.1
InnerLayer 1 (GND):
  pour cut-out: -85,-37.9 -80.6,-37.9 -80.6,-42.1 -85,-42.1
InnerLayer 2 (Signal):
  pour cut-out: -85,-37.9 -80.6,-37.9 -80.6,-42.1 -85,-42.1
InnerLayer 5 (GND):
  pour cut-out: -85,-37.9 -80.6,-37.9 -80.6,-42.1 -85,-42.1
InnerLayer 6 (Signal):
  pour cut-out: -85,-37.9 -80.6,-37.9 -80.6,-42.1 -85,-42.1
InnerLayer 3 (GND):
  pour cut-out: -85,-37.9 -80.6,-37.9 -80.6,-42.1 -85,-42.1
InnerLayer 4 (Power):
  pour cut-out: -85,-37.9 -80.6,-37.9 -80.6,-42.1 -85,-42.1
Bottom Layer:
  pour cut-out: -85,-37.9 -80.6,-37.9 -80.6,-42.1 -85,-42.1

## Silkscreen, mask and mechanical layers (free items; w line width, h text height)
Top Overlay:
  text "CAN" at 18.89,42.777 h2
  text "VEHICLE INTERFACE TESTER" at -31.674,-1.558 h5
  text "SWD" at -72.823,-12.058 h2 r270
  text "POWER" at -29.966,-34.623 h2
  text "USB" at 5.249,-34.623 h2
Bottom Overlay:
  lines w0.254: -63.75,-27 -37,-27 -37,-2 -63.75,-2 -63.75,-27 ; 30.4,-29.1 61.4,-29.1 61.4,-11 30.4,-11 30.4,-29.1
  text "PRODUCT JTAG" at -74.177,14.798 h2 r90
  text "RIG JTAG" at 75.423,12.019 h2 r90
  text "3V3" at 33.96,-13.267 h1.5
  text "14V" at -59.704,-25.873 h2

## Text inside footprints (layer, text, board x,y; h text height)
J7: Mechanical 13 "PCB EDGE" at 47.5,-43.1 h0.81 r180
U2: Top Designator "1" at -49.35,-31.5 h1.27 r270
U3: Mechanical 13 "*" at -57.93,-8.143 h1.27 r180